# Altium PCB ACF_Out-v2.0.PcbDoc (part 3 of 3)
Units mm, origin at the board's own origin, x right, y up, seen from the top; angles counter-clockwise.
Board outline 145.27 x 100 mm, 2 copper layers (Top Layer, Bottom Layer), stack 1.57 mm thick; 63 components, 69 nets, 230 pads, 136 vias.
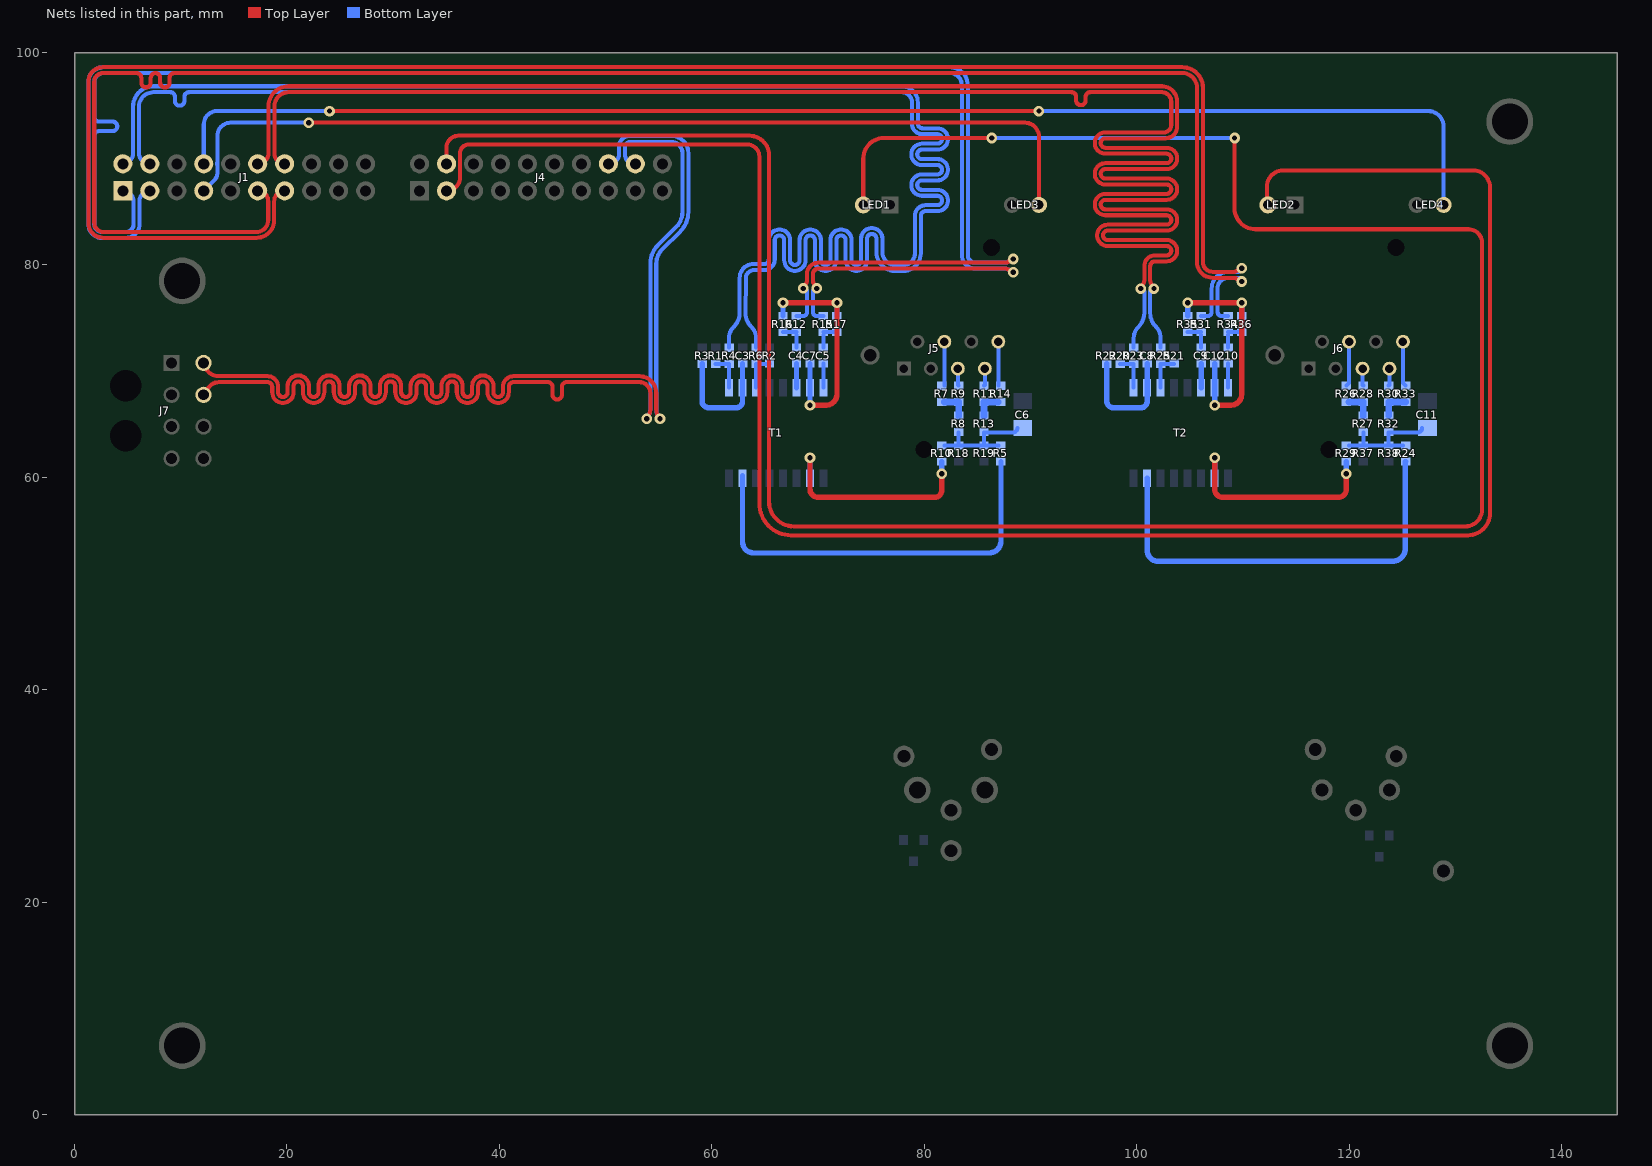
[diagram p2: the nets of this part, all layers, seen from the top]

## Via types
v1: diameter 1, hole 0.5, Top Layer to Bottom Layer, tented both sides, 136 vias

## Nets (pads, with @x,y where several pads share a name; then routed paths per layer and width w, separated by ;. In a path a pad name is that pad's centre, name@x,y a point inside that pad or via, vN(x,y) a via of type N, cw(c..) or ccw(c..) an arc to the next point about the centre after c; other vN are vias at no path point) (continued)
LATCH_N: J4.18 J7.6 | length 105.2
  Top Layer w0.381: J7.6@12.144,67.775 12.625,68.461 cw(c13.601,67.775) 13.601,68.968 16.251,68.968 18.168,68.968 cw(c18.168,68.524) 18.613,68.524 18.613,68.014 ccw(c19.616,68.014) 20.619,68.014 20.619,68.596 cw(c21.064,68.596) 21.508,68.596 21.508,68.014 ccw(c22.512,68.014) 23.515,68.014 23.515,68.596 cw(c23.96,68.596) 24.404,68.596 24.404,68.014 ccw(c25.407,68.014) 26.411,68.014 26.411,68.596 cw(c26.855,68.596) 27.3,68.596 27.3,68.014 ccw(c28.303,68.014) 29.306,68.014 29.306,68.596 cw(c29.751,68.596) 30.195,68.596 30.195,68.014 ccw(c31.199,68.014) 32.202,68.014 32.202,68.596 cw(c32.646,68.596) 33.091,68.596 33.091,68.014 ccw(c34.094,68.014) 35.097,68.014 35.097,68.596 cw(c35.542,68.596) 35.986,68.596 35.986,68.014 ccw(c36.99,68.014) 37.993,68.014 37.993,68.596 cw(c38.438,68.596) 38.882,68.596 38.882,68.014 ccw(c39.885,68.014) 40.889,68.014 40.889,68.524 cw(c41.333,68.524) 41.333,68.968 42.845,68.968 43.478,68.968 44.557,68.968 cw(c44.557,68.524) 45.002,68.524 45.002,67.785 ccw(c45.446,67.785) 45.891,67.785 45.891,68.524 cw(c46.335,68.524) 46.335,68.968 47.752,68.968 53.177,68.968 cw(c53.177,67.934) 54.212,67.934 54.212,66.371 cw(c53.025,66.371) v1(53.864,65.532)
  Bottom Layer w0.381: J4.18@52.806,89.524 52.715,89.524 cw(c52.715,90.424) 51.815,90.424 51.815,91.048 cw(c52.354,91.048) 52.354,91.588 56.198,91.588 cw(c56.198,90.555) 57.231,90.555 57.231,84.988 cw(c55.22,84.988) 56.642,83.566 54.906,81.83 ccw(c56.581,80.154) 54.212,80.154 54.212,80.152 54.212,66.371 cw(c53.429,66.371) 53.982,65.818 ccw(c54.268,65.532) v1(53.864,65.532)
LATCH_P: J4.16 J7.5 | length 105.4
  Top Layer w0.381: J7.5@12.144,70.775 12.41,70.229 ccw(c13.532,70.775) 13.532,69.527 16.251,69.527 18.168,69.527 cw(c18.168,68.524) 19.172,68.524 19.172,68.014 ccw(c19.616,68.014) 20.061,68.014 20.061,68.596 cw(c21.064,68.596) 22.067,68.596 22.067,68.014 ccw(c22.512,68.014) 22.956,68.014 22.956,68.596 cw(c23.96,68.596) 24.963,68.596 24.963,68.014 ccw(c25.407,68.014) 25.852,68.014 25.852,68.596 cw(c26.855,68.596) 27.858,68.596 27.858,68.014 ccw(c28.303,68.014) 28.747,68.014 28.747,68.596 cw(c29.751,68.596) 30.754,68.596 30.754,68.014 ccw(c31.199,68.014) 31.643,68.014 31.643,68.596 cw(c32.646,68.596) 33.65,68.596 33.65,68.014 ccw(c34.094,68.014) 34.539,68.014 34.539,68.596 cw(c35.542,68.596) 36.545,68.596 36.545,68.014 ccw(c36.99,68.014) 37.434,68.014 37.434,68.596 cw(c38.438,68.596) 39.441,68.596 39.441,68.014 ccw(c39.885,68.014) 40.33,68.014 40.33,68.524 cw(c41.333,68.524) 41.333,69.527 42.845,69.527 53.177,69.527 cw(c53.177,67.934) 54.77,67.934 54.77,66.371 ccw(c55.957,66.371) v1(55.118,65.532)
  Bottom Layer w0.381: J4.16@50.266,89.524 50.356,89.524 ccw(c50.356,90.424) 51.256,90.424 51.256,91.109 cw(c52.294,91.109) 52.294,92.146 56.198,92.146 cw(c56.198,90.555) 57.79,90.555 57.79,84.986 cw(c55.224,84.986) 57.038,83.172 55.326,81.46 ccw(c56.668,80.118) 54.77,80.118 54.77,66.371 ccw(c55.553,66.371) 55,65.818 cw(c54.714,65.532) v1(55.118,65.532)
NetC3_2: C3.2 R3.2 T1.2 | length 11.6
  Bottom Layer w0.508: R3.2@59.083,70.685 59.083,67.19 ccw(c59.718,67.19) 59.718,66.555 62.291,66.555 ccw(c62.291,67.158) 62.893,67.158 T1.2@62.893,68.446 C3.2@62.893,70.711
NetC4_1: C4.1 R12.2 R16.1 | length 2.5
  Bottom Layer w0.381: R16.1@66.703,73.671 R12.2@67.969,73.671 ; R12.2@67.969,73.417 67.969,72.235 C4.1@67.973,72.235
NetC4_2: C4.2 T1.6 | length 2.3
  Bottom Layer w0.508: T1.6@67.973,68.446 C4.2@67.973,70.711
NetC5_1: C5.1 R15.2 R17.1 | length 2.5
  Bottom Layer w0.381: C5.1@70.513,72.235 R15.2@70.513,73.417 ; R15.2@70.513,73.671 R17.1@71.783,73.671
NetC5_2: C5.2 T1.8 | length 2.3
  Bottom Layer w0.381: T1.8@70.513,68.446 C5.2@70.513,70.711
NetC6_2: C6.2 R5.1 R8.2 R10.1 R13.2 R18.1 R19.2 | length 10.9
  Bottom Layer w0.381: R10.1@81.895,63.017 R18.1@83.241,63.017 ; R8.2@83.241,64.237 R18.1@83.241,63.017 ; R5.1@86.975,63.017 R19.2@85.629,63.017 ; C6.2@88.773,64.643 cw(c88.367,64.643) 88.367,64.237 85.629,64.237 R19.2@85.629,63.017 ; R18.1@83.241,63.017 R19.2@85.629,63.017
NetC7_2: C7.2 R16.2 R17.2 T1.7 | length 23.3
  Top Layer w0.508: v1(66.703,76.454) v1(71.783,76.454) 71.783,67.818 cw(c70.767,67.818) 70.767,66.802 v1(69.243,66.802)
  Bottom Layer w0.508: R16.2@66.703,75.195 v1(66.703,76.454) ; v1(69.243,66.802) T1.7@69.243,68.446 C7.2@69.243,70.711 ; R17.2@71.783,75.195 v1(71.783,76.454)
NetC8_2: C8.2 R22.2 T2.2 | length 11.6
  Bottom Layer w0.508: R22.2@97.183,70.685 97.183,67.19 ccw(c97.818,67.19) 97.818,66.555 100.391,66.555 ccw(c100.391,67.158) 100.993,67.158 T2.2@100.993,68.446 C8.2@100.993,70.711
NetC9_1: C9.1 R31.2 R35.1 | length 2.5
  Bottom Layer w0.381: R35.1@104.803,73.671 R31.2@106.069,73.671 ; R31.2@106.069,73.417 106.069,72.235 C9.1@106.073,72.235
NetC9_2: C9.2 T2.6 | length 2.3
  Bottom Layer w0.508: T2.6@106.073,68.446 C9.2@106.073,70.711
NetC10_1: C10.1 R34.2 R36.1 | length 2.5
  Bottom Layer w0.381: C10.1@108.613,72.235 R34.2@108.613,73.417 ; R34.2@108.613,73.671 R36.1@109.883,73.671
NetC10_2: C10.2 T2.8 | length 2.3
  Bottom Layer w0.381: T2.8@108.613,68.446 C10.2@108.613,70.711
NetC11_2: C11.2 R24.1 R27.2 R29.1 R32.2 R37.1 R38.2 | length 10.9
  Bottom Layer w0.381: R29.1@119.995,63.017 R37.1@121.341,63.017 ; R27.2@121.341,64.237 R37.1@121.341,63.017 ; R24.1@125.075,63.017 R38.2@123.729,63.017 ; C11.2@126.873,64.643 cw(c126.467,64.643) 126.467,64.237 123.729,64.237 R38.2@123.729,63.017 ; R37.1@121.341,63.017 R38.2@123.729,63.017
NetC12_2: C12.2 R35.2 R36.2 T2.7 | length 23.3
  Top Layer w0.508: v1(104.803,76.454) v1(109.883,76.454) 109.883,67.818 cw(c108.867,67.818) 108.867,66.802 v1(107.343,66.802)
  Bottom Layer w0.508: R35.2@104.803,75.195 v1(104.803,76.454) ; v1(107.343,66.802) T2.7@107.343,68.446 C12.2@107.343,70.711 ; R36.2@109.883,75.195 v1(109.883,76.454)
NetJ5_4: J5.4 R7.1 | length 4.1
  Bottom Layer w0.381: R7.1@81.895,68.631 J5.4@81.895,72.775
NetJ5_5: J5.5 R9.1 | length 1.6
  Bottom Layer w0.381: J5.5@83.165,70.235 83.165,68.707 R9.1@83.241,68.631
NetJ5_7: J5.7 R11.1 | length 1.6
  Bottom Layer w0.381: R11.1@85.629,68.631 85.705,68.707 J5.7@85.705,70.235
NetJ5_8: J5.8 R14.1 | length 4.1
  Bottom Layer w0.381: R14.1@86.975,68.631 J5.8@86.975,72.775
NetJ6_4: J6.4 R26.1 | length 4.2
  Bottom Layer w0.381: R26.1@119.745,68.631 119.995,68.881 J6.4@119.995,72.775
NetJ6_5: J6.5 R28.1 | length 1.6
  Bottom Layer w0.381: J6.5@121.265,70.235 121.265,68.707 R28.1@121.341,68.631
NetJ6_7: J6.7 R30.1 | length 1.6
  Bottom Layer w0.381: R30.1@123.729,68.631 123.805,68.707 J6.7@123.805,70.235
NetJ6_8: J6.8 R33.1 | length 4.2
  Bottom Layer w0.381: J6.8@125.075,72.775 125.075,68.881 R33.1@125.325,68.631
NetR1_2: R1.2 R4.2 T1.1 | length 3.5
  Bottom Layer w0.381: R1.2@60.353,70.685 R4.2@61.623,70.685 T1.1@61.623,68.446
NetR2_2: R2.2 R6.2 T1.3 | length 3.5
  Bottom Layer w0.381: T1.3@64.163,68.446 R6.2@64.163,70.685 65.408,70.685 ccw(c65.408,70.711) R2.2@65.433,70.711
NetR5_2: R5.2 T1.15 | length 39.3
  Bottom Layer w0.508: T1.15@62.893,60.173 T1.15@62.893,59.916 62.893,53.911 ccw(c63.921,53.911) 63.921,52.883 86.107,52.883 ccw(c86.107,54) 87.225,54 R5.2@87.225,61.493
NetR7_2: R7.2 R8.1 R9.2 | length 2.7
  Bottom Layer w0.635: R7.2@81.895,67.107 R9.2@83.241,67.107 R8.1@83.241,65.761
NetR10_2: R10.2 T1.10 | length 20.8
  Top Layer w0.508: v1(69.243,61.837) 69.243,58.906 ccw(c70.03,58.906) 70.03,58.119 80.989,58.119 ccw(c80.989,58.774) 81.645,58.774 v1(81.645,60.344)
  Bottom Layer w0.508: T1.10@69.243,59.916 v1(69.243,61.837) ; v1(81.645,60.344) R10.2@81.645,61.493
NetR11_2: R11.2 R13.1 R14.2 | length 2.7
  Bottom Layer w0.635: R13.1@85.629,65.761 R11.2@85.629,67.107 R14.2@86.975,67.107
NetR20_2: R20.2 R23.2 T2.1 | length 3.5
  Bottom Layer w0.381: R20.2@98.453,70.685 R23.2@99.723,70.685 T2.1@99.723,68.446
NetR21_2: R21.2 R25.2 T2.3 | length 3.5
  Bottom Layer w0.381: T2.3@102.263,68.446 R25.2@102.263,70.685 R21.2@103.508,70.685
NetR24_2: R24.2 T2.15 | length 40.6
  Bottom Layer w0.508: T2.15@100.993,59.916 100.993,53.15 ccw(c102.056,53.15) 102.056,52.087 124.056,52.087 ccw(c124.056,53.337) 125.306,53.337 125.306,61.475 cw(c125.325,61.475) R24.2@125.325,61.493
NetR26_2: R26.2 R27.1 R28.2 | length 2.7
  Bottom Layer w0.635: R26.2@119.995,67.107 R28.2@121.341,67.107 R27.1@121.341,65.761
NetR29_2: R29.2 T2.10 | length 20.7
  Top Layer w0.508: v1(107.343,61.837) 107.343,58.906 ccw(c108.13,58.906) 108.13,58.119 118.979,58.119 ccw(c118.979,58.885) 119.745,58.885 v1(119.745,60.344)
  Bottom Layer w0.508: T2.10@107.343,59.916 v1(107.343,61.837) ; v1(119.745,60.344) R29.2@119.745,61.493
NetR30_2: R30.2 R32.1 R33.2 | length 2.9
  Bottom Layer w0.635: R32.1@123.729,65.811 R30.2@123.729,67.107 R33.2@125.325,67.107
P1LED: J1.07 LED3.1 | length 90.9
  Top Layer w0.381: v1(22.05,93.396) 89.484,93.396 cw(c89.484,92.08) 90.8,92.08 LED3.1@90.8,85.655
  Bottom Layer w0.381: J1.07@12.166,86.984 13.18,87.999 ccw(c12.555,88.624) 13.439,88.624 13.439,89.446 ccw(c13.058,89.446) 13.439,89.464 cw(c14.706,89.524) 13.439,89.585 ccw(c13.058,89.603) 13.439,89.603 13.439,92.148 cw(c14.687,92.148) 14.687,93.396 v1(22.05,93.396)
P2LED: J1.08 LED4.1 | length 129.4
  Top Layer w0.381: v1(24.006,94.488) v1(90.8,94.488)
  Bottom Layer w0.381: J1.08@12.166,89.524 12.166,93.238 cw(c13.416,93.238) 13.416,94.488 v1(24.006,94.488) ; v1(90.8,94.488) 127.459,94.488 cw(c127.459,93.047) 128.9,93.047 LED4.1@128.9,85.655
RXI1_N: J1.01 R15.1 | length 154
  Top Layer w0.381: v1(69.868,77.792) ccw(c69.464,77.792) 69.75,78.078 69.694,78.134 cw(c70.114,78.553) 69.521,78.553 69.521,79.144 cw(c70.03,79.144) 70.03,79.653 87.626,79.653 cw(c87.626,79.06) 88.045,79.48 88.101,79.424 ccw(c88.387,79.71) v1(88.387,79.306)
  Bottom Layer w0.381: J1.01@4.546,86.984 cw(c4.546,85.965) 5.565,85.965 5.565,83.845 cw(c4.829,83.845) 4.829,83.109 2.592,83.109 cw(c2.592,83.845) 1.855,83.845 1.855,91.084 1.855,92.164 cw(c2.3,92.164) 2.3,92.608 3.58,92.608 ccw(c3.58,93.053) 3.58,93.497 2.3,93.497 cw(c2.3,93.942) 1.855,93.942 1.855,95.737 1.855,97.183 cw(c2.74,97.183) 2.74,98.068 82.394,98.068 cw(c82.394,96.919) 83.543,96.919 83.543,80.926 ccw(c84.816,80.926) 84.816,79.653 87.626,79.653 cw(c87.626,79.06) 88.045,79.48 88.101,79.424 ccw(c88.387,79.71) v1(88.387,79.306) ; v1(69.868,77.792) ccw(c69.868,77.445) 69.521,77.445 69.521,75.576 ccw(c69.902,75.576) 69.902,75.195 R15.1@70.513,75.195
RXI1_P: J1.03 R12.1 | length 153.9
  Top Layer w0.381: v1(68.614,77.792) cw(c69.018,77.792) 68.733,78.078 68.788,78.134 ccw(c68.368,78.553) 68.962,78.553 68.962,79.144 cw(c70.03,79.144) 70.03,80.212 87.626,80.212 ccw(c87.626,80.806) 88.045,80.386 88.101,80.441 cw(c88.387,80.156) v1(88.387,80.56)
  Bottom Layer w0.381: J1.03@7.086,86.984 ccw(c7.086,86.023) 6.124,86.023 6.124,83.845 cw(c4.829,83.845) 4.829,82.55 2.592,82.55 cw(c2.592,83.845) 1.297,83.845 1.297,97.183 cw(c2.74,97.183) 2.74,98.627 82.394,98.627 cw(c82.394,96.919) 84.102,96.919 84.102,80.926 ccw(c84.816,80.926) 84.816,80.212 87.626,80.212 ccw(c87.626,80.806) 88.045,80.386 88.101,80.441 cw(c88.387,80.156) v1(88.387,80.56) ; R12.1@67.969,75.195 68.581,75.195 ccw(c68.581,75.576) 68.962,75.576 68.962,77.445 ccw(c68.614,77.445) v1(68.614,77.792)
RXI2_N: J1.11 R34.1 | length 171.1
  Top Layer w0.381: J1.11@17.246,86.984 cw(c17.246,85.99) 18.24,85.99 18.24,84.226 cw(c17.122,84.226) 17.122,83.109 2.722,83.109 cw(c2.722,83.976) 1.855,83.976 1.855,97.236 cw(c2.688,97.236) 2.688,98.068 4.76,98.068 5.839,98.068 cw(c5.839,97.623) 6.284,97.623 6.284,97.162 ccw(c6.728,97.162) 7.173,97.162 7.173,97.623 cw(c7.617,97.623) 8.062,97.623 8.062,97.162 ccw(c8.506,97.162) 8.951,97.162 8.951,97.623 cw(c9.395,97.623) 9.395,98.068 10.146,98.068 104.292,98.068 cw(c104.292,96.679) 105.681,96.679 105.681,80.276 ccw(c107.166,80.276) 107.166,78.791 109.122,78.791 cw(c109.122,78.197) 109.542,78.617 109.597,78.562 ccw(c109.883,78.848) v1(109.883,78.443)
  Bottom Layer w0.381: R34.1@108.613,75.195 108.002,75.195 cw(c108.002,75.576) 107.621,75.576 107.621,77.773 cw(c108.638,77.773) 108.638,78.791 109.535,78.791 cw(c109.535,78.443) v1(109.883,78.443)
RXI2_P: J1.13 R31.1 | length 170.7
  Top Layer w0.381: J1.13@19.786,86.984 ccw(c19.786,85.997) 18.799,85.997 18.799,84.226 cw(c17.122,84.226) 17.122,82.55 2.722,82.55 cw(c2.722,83.976) 1.297,83.976 1.297,97.236 cw(c2.688,97.236) 2.688,98.627 104.292,98.627 cw(c104.292,96.679) 106.239,96.679 106.239,80.276 ccw(c107.166,80.276) 107.166,79.35 109.122,79.35 ccw(c109.122,79.943) 109.542,79.523 109.597,79.579 cw(c109.883,79.293) v1(109.883,79.697)
  Bottom Layer w0.381: R31.1@106.069,75.195 106.681,75.195 ccw(c106.681,75.576) 107.062,75.576 107.062,77.773 cw(c108.638,77.773) 108.638,79.35 109.535,79.35 ccw(c109.535,79.697) v1(109.883,79.697)
TXI1_N: J1.02 R6.1 | length 157.2
  Bottom Layer w0.381: J1.02@4.546,89.524 ccw(c4.546,90.493) 5.514,90.493 5.514,94.918 cw(c7.421,94.918) 7.421,96.824 77.884,96.824 cw(c77.884,95.308) 79.4,95.308 ; R6.1@64.163,72.209 64.163,73.106 ccw(c62.645,73.106) 63.718,74.179 63.706,74.192 cw(c64.98,75.465) 63.179,75.465 63.201,78.721 cw(c63.995,78.721) 63.995,79.515 64.925,79.515 ccw(c64.925,80.518) 65.928,80.518 65.928,82.336 cw(c66.373,82.336) 66.817,82.336 66.817,80.446 ccw(c67.82,80.446) 68.824,80.446 68.824,82.336 cw(c69.268,82.336) 69.713,82.336 69.713,80.446 ccw(c70.716,80.446) 71.719,80.446 71.719,82.336 cw(c72.164,82.336) 72.608,82.336 72.608,80.446 ccw(c73.612,80.446) 74.615,80.446 74.615,82.48 cw(c75.059,82.48) 75.504,82.48 75.504,81.198 ccw(c77.263,81.198) 77.263,79.439 78.035,79.439 ccw(c78.035,81.083) 79.679,81.083 79.679,84.622 cw(c80.124,84.622) 80.124,85.067 81.237,85.067 ccw(c81.237,86.07) 81.237,87.073 79.787,87.073 cw(c79.787,87.518) 79.787,87.962 81.237,87.962 ccw(c81.237,88.965) 81.237,89.969 79.787,89.969 cw(c79.787,90.413) 79.787,90.858 81.237,90.858 ccw(c81.237,91.861) 81.237,92.864 ; 79.4,95.228 79.4,93.309 ccw(c79.844,93.309) 79.844,92.864 81.237,92.864 ; 82.235,91.757 ccw(c81.237,91.861) 81.237,92.864
TXI1_P: J1.04 R4.1 | length 155.6
  Bottom Layer w0.381: J1.04@7.086,89.524 cw(c7.086,90.537) 6.073,90.537 6.073,94.918 cw(c7.421,94.918) 7.421,96.266 7.927,96.266 9.006,96.266 cw(c9.006,95.821) 9.451,95.821 9.451,95.442 ccw(c9.895,95.442) 10.34,95.442 10.34,95.821 cw(c10.784,95.821) 10.784,96.266 11.506,96.266 77.884,96.266 cw(c77.884,95.308) 78.841,95.308 ; R4.1@61.623,72.209 61.623,73.106 cw(c63.141,73.106) 62.067,74.179 ccw(c60.733,75.514) 62.62,75.465 62.62,78.77 62.62,78.773 cw(c63.928,78.773) 63.992,80.08 64.109,80.074 64.925,80.074 ccw(c64.925,80.518) 65.369,80.518 65.369,82.336 cw(c66.373,82.336) 67.376,82.336 67.376,80.446 ccw(c67.82,80.446) 68.265,80.446 68.265,82.336 cw(c69.268,82.336) 70.271,82.336 70.271,80.446 ccw(c70.716,80.446) 71.16,80.446 71.16,82.336 cw(c72.164,82.336) 73.167,82.336 73.167,80.446 ccw(c73.612,80.446) 74.056,80.446 74.056,82.48 cw(c75.059,82.48) 76.063,82.48 76.063,81.198 ccw(c77.263,81.198) 77.263,79.998 78.035,79.998 ccw(c78.035,81.083) 79.12,81.083 79.12,84.622 cw(c80.124,84.622) 80.124,85.625 81.237,85.625 ccw(c81.237,86.07) 81.237,86.514 79.787,86.514 cw(c79.787,87.518) 79.787,88.521 81.237,88.521 ccw(c81.237,88.965) 81.237,89.41 79.787,89.41 cw(c79.787,90.413) 79.787,91.417 81.237,91.417 ccw(c81.237,91.861) 81.237,92.306 79.844,92.306 cw(c79.844,93.309) 78.841,93.309 78.841,95.228
TXI2_N: J1.12 R25.1 | length 171.3
  Top Layer w0.381: J1.12@17.246,89.524 ccw(c17.246,90.544) 18.265,90.544 18.265,94.944 cw(c20.146,94.944) 20.146,96.824 102.368,96.824 cw(c102.368,95.377) 103.816,95.377 103.816,93.038 cw(c102.698,93.038) 102.698,91.921 97.06,91.921 ccw(c97.06,91.476) 97.06,91.032 102.815,91.032 cw(c102.815,90.029) 102.815,89.025 97.06,89.025 ccw(c97.06,88.581) 97.06,88.136 102.815,88.136 cw(c102.815,87.133) 102.815,86.13 97.06,86.13 ccw(c97.06,85.685) 97.06,85.241 102.815,85.241 cw(c102.815,84.237) 102.815,83.234 97.282,83.234 ccw(c97.282,82.79) 97.282,82.345 102.815,82.345 cw(c102.815,81.342) 102.815,80.338 101.723,80.338 ccw(c101.723,79.894) 101.279,79.894 101.279,78.536 ccw(c101.872,78.536) 101.452,78.116 101.508,78.061 cw(c101.222,77.775) v1(101.626,77.775)
  Bottom Layer w0.381: v1(101.626,77.775) ccw(c101.626,77.427) 101.279,77.427 101.279,75.465 ccw(c103.08,75.465) 101.806,74.192 101.818,74.179 cw(c100.745,73.106) 102.263,73.106 R25.1@102.263,72.209
TXI2_P: J1.14 R23.1 | length 171.1
  Top Layer w0.381: J1.14@19.786,89.524 cw(c19.786,90.486) 18.824,90.486 18.824,94.944 cw(c20.146,94.944) 20.146,96.266 92.781,96.266 93.86,96.266 cw(c93.86,95.821) 94.305,95.821 94.305,95.49 ccw(c94.749,95.49) 95.194,95.49 95.194,95.821 cw(c95.638,95.821) 95.638,96.266 96.52,96.266 102.368,96.266 cw(c102.368,95.377) 103.257,95.377 103.257,93.19 cw(c102.547,93.19) 102.547,92.48 97.06,92.48 ccw(c97.06,91.476) 97.06,90.473 102.815,90.473 cw(c102.815,90.029) 102.815,89.584 97.06,89.584 ccw(c97.06,88.581) 97.06,87.577 102.815,87.577 cw(c102.815,87.133) 102.815,86.688 97.06,86.688 ccw(c97.06,85.685) 97.06,84.682 102.815,84.682 cw(c102.815,84.237) 102.815,83.793 97.282,83.793 ccw(c97.282,82.79) 97.282,81.786 102.815,81.786 cw(c102.815,81.342) 102.815,80.897 101.723,80.897 ccw(c101.723,79.894) 100.72,79.894 100.72,78.536 cw(c100.126,78.536) 100.546,78.116 100.491,78.061 ccw(c100.777,77.775) v1(100.372,77.775)
  Bottom Layer w0.381: R23.1@99.723,72.209 99.723,73.106 cw(c101.241,73.106) 100.167,74.179 ccw(c98.833,75.514) 100.72,75.465 100.72,77.427 ccw(c100.372,77.427) v1(100.372,77.775)
W5500_LED_ACT: J4.03 LED2.2 | length 193.1
  Top Layer w0.381: J4.03@35.026,86.984 ccw(c35.026,88.258) 36.299,88.258 36.299,88.417 36.298,89.207 ; 36.297,89.207 36.297,89.503 36.297,90.05 36.297,90.505 cw(c37.129,90.505) 37.129,91.337 63.343,91.337 cw(c63.343,90.201) 64.479,90.201 64.479,57.544 ccw(c67.475,57.544) 67.475,54.547 131.179,54.547 ccw(c131.179,56.638) 133.269,56.638 133.269,87.317 ccw(c131.686,87.317) 131.686,88.9 113.792,88.9 ccw(c113.792,87.376) 112.268,87.376 112.268,85.747 ccw(c112.36,85.747) LED2.2@112.36,85.655
W5500_LED_LINK: J4.04 LED1.2 | length 232.9
  Top Layer w0.381: J4.04@35.026,89.524 35.026,91.048 cw(c36.15,91.048) 36.15,92.173 63.538,92.173 cw(c63.538,90.318) 65.393,90.318 65.393,57.719 ccw(c67.726,57.719) 67.726,55.386 130.954,55.386 ccw(c130.954,56.947) 132.514,56.947 132.514,82.093 ccw(c131.244,82.093) 131.244,83.363 111.201,83.363 cw(c111.201,85.344) 109.22,85.344 v1(109.22,91.948) ; LED1.2@74.26,85.655 74.26,90.008 cw(c76.2,90.008) 76.2,91.948 v1(86.36,91.948)
  Bottom Layer w0.381: v1(86.36,91.948) v1(109.22,91.948)
pads on no net: J2.4 J2.5 J3.4 J3.5 J5. J6. J7. T1.4 T1.5 T1.12 T1.13 T2.4 T2.5 T2.12 T2.13

## Polygon pours and split planes (outlines as drawn)
GND_DRIVE on Top Layer "NONET_L-01_P-001" (solid, pour order 0): 71.326,84.176 ccw(c71.935,84.176) 71.935,83.566 88.575,83.566 ccw(c88.609,84.418) 89.461,84.385 89.461,86.194 ccw(c88.979,86.194) 88.979,86.677 71.935,86.677 ccw(c71.935,86.067) 71.326,86.067
GND on Top Layer "NONET_L-01_P-001" (solid, pour order 1): 0,0 0,100 145.27,100 145.27,0
GND_DRIVE on Bottom Layer "NONET_L-01_P-001" (solid, pour order 3): 126.759,86.677 cw(c126.759,85.89) 127.545,85.89 127.545,83.603 cw(c126.81,83.603) 126.81,82.868 94.377,82.868 85.731,82.868 cw(c85.731,83.273) 85.326,83.273 85.326,86.067 cw(c85.935,86.067) 85.935,86.677
GND on Bottom Layer "NONET_L-01_P-001" (solid, pour order 2): 0,0 0,100 145.27,100 145.27,0

## Other copper
Multi-Layer:
  pour cut-out: 135.135,89.767 cw(c135.135,93.5) 131.402,93.5 cw(c135.135,93.5) 135.135,97.233 cw(c135.135,93.5) 138.868,93.5 cw(c135.135,93.5)
  pour cut-out: 10.135,2.767 cw(c10.135,6.5) 6.402,6.5 cw(c10.135,6.5) 10.135,10.233 cw(c10.135,6.5) 13.868,6.5 cw(c10.135,6.5)
  pour cut-out: 135.135,2.767 cw(c135.135,6.5) 131.402,6.5 cw(c135.135,6.5) 135.135,10.233 cw(c135.135,6.5) 138.868,6.5 cw(c135.135,6.5)

## Silkscreen, mask and mechanical layers (free items; w line width, h text height)
Top Overlay:
  text "ACF_OUT" at 115.038,96.869 h1.4
  text "rev_001-03" at 113.06,93.906 h1.4
Bottom Overlay:
  lines w0.254: 60.643,69.926 58.115,69.926 58.115,75.946 73.711,75.946 73.711,69.926 62.893,69.926 ; 61.09,75.946 61.09,87.034 ; 84.76,56.109 84.76,59.047 ; 98.743,69.926 96.215,69.926 96.215,75.946 111.811,75.946 111.811,69.926 100.993,69.926 ; 99.19,75.946 99.19,77.343 ; 111.735,87.122 111.735,89.306 87.249,89.306 87.249,77.343 111.794,77.343 111.794,84.024 ; 122.86,56.109 122.86,59.047 ; 58.617,87.034 58.617,96.672 83.162,96.672 83.162,87.034 58.617,87.034 ; 78.924,38.911 92.513,38.911 92.513,56.082 78.924,56.082 78.924,38.911 ; 79.07,59.08 91.44,59.08 91.44,69.926 79.07,69.926 79.07,59.08 ; 117.17,59.08 129.54,59.08 129.54,69.926 117.17,69.926 117.17,59.08 ; 117.323,38.862 131.75,38.862 131.75,56.032 117.323,56.032 117.323,38.862
Dimension:
  circle w0.013: c135.135,93.5 r1.7
  circle w0.013: c135.135,6.5 r1.7
  circle w0.013: c10.135,6.5 r1.7
  circle w0.013: c10.135,78.5 r1.7
  circle w0.013: c124.44,33.745 r0.6
  circle w0.013: c78.72,34.38 r0.6
  circle w0.013: c79.355,30.57 r0.6
  circle w0.013: c123.805,30.57 r0.6
  circle w0.013: c120.63,28.665 r0.6
  circle w0.013: c117.455,30.57 r0.6
  circle w0.013: c116.82,34.38 r0.6
  circle w0.013: c82.53,28.665 r0.6
  circle w0.013: c85.705,30.57 r0.6
  circle w0.013: c86.34,33.745 r0.6
  circle w0.013: c128.885,22.95 r0.6
  circle w0.013: c117.455,72.775 r0.4
  circle w0.013: c89.53,85.655 r0.25
  circle w0.013: c78.085,70.235 r0.4
  circle w0.013: c80.625,70.235 r0.4
  circle w0.013: c83.165,70.235 r0.4
  circle w0.013: c85.705,70.235 r0.4
  circle w0.013: c79.99,62.615 r0.8
  circle w0.013: c86.34,81.665 r0.8
  circle w0.013: c75.53,85.655 r0.25
  circle w0.013: c74.91,71.505 r0.6
  circle w0.013: c118.725,70.235 r0.4
  circle w0.013: c121.265,70.235 r0.4
  circle w0.013: c123.805,70.235 r0.4
  circle w0.013: c118.09,62.615 r0.8
  circle w0.013: c119.995,72.775 r0.4
  circle w0.013: c122.535,72.775 r0.4
  circle w0.013: c125.075,72.775 r0.4
  circle w0.013: c116.185,70.235 r0.4
  circle w0.013: c127.63,85.655 r0.25
  circle w0.013: c113.01,71.505 r0.6
  circle w0.013: c113.63,85.655 r0.25
  circle w0.013: c124.44,81.665 r0.8
  circle w0.013: c79.355,72.775 r0.4
  circle w0.013: c81.895,72.775 r0.4
  circle w0.013: c84.435,72.775 r0.4
  circle w0.013: c86.975,72.775 r0.4
  circle w0.013: c52.806,89.524 r0.55
  circle w0.013: c50.266,86.984 r0.55
  circle w0.013: c50.266,89.524 r0.55
  circle w0.013: c47.726,86.984 r0.55
  circle w0.013: c55.346,86.984 r0.55
  circle w0.013: c55.346,89.524 r0.55
  circle w0.013: c52.806,86.984 r0.55
  circle w0.013: c19.786,89.524 r0.55
  circle w0.013: c17.246,86.984 r0.55
  circle w0.013: c17.246,89.524 r0.55
  circle w0.013: c14.706,86.984 r0.55
  circle w0.013: c24.866,89.524 r0.55
  circle w0.013: c22.326,86.984 r0.55
  circle w0.013: c22.326,89.524 r0.55
  circle w0.013: c19.786,86.984 r0.55
  circle w0.013: c9.626,89.524 r0.55
  circle w0.013: c7.086,86.984 r0.55
  circle w0.013: c7.086,89.524 r0.55
  circle w0.013: c4.546,86.984 r0.55
  circle w0.013: c14.706,89.524 r0.55
  circle w0.013: c12.166,86.984 r0.55
  circle w0.013: c12.166,89.524 r0.55
  circle w0.013: c9.626,86.984 r0.55
  circle w0.013: c42.646,89.524 r0.55
  circle w0.013: c40.106,86.984 r0.55
  circle w0.013: c40.106,89.524 r0.55
  circle w0.013: c37.566,86.984 r0.55
  circle w0.013: c47.726,89.524 r0.55
  circle w0.013: c45.186,86.984 r0.55
  circle w0.013: c45.186,89.524 r0.55
  circle w0.013: c42.646,86.984 r0.55
  circle w0.013: c32.486,89.524 r0.55
  circle w0.013: c27.406,86.984 r0.55
  circle w0.013: c27.406,89.524 r0.55
  circle w0.013: c24.866,86.984 r0.55
  circle w0.013: c37.566,89.524 r0.55
  circle w0.013: c35.026,86.984 r0.55
  circle w0.013: c35.026,89.524 r0.55
  circle w0.013: c32.486,86.984 r0.55
  circle w0.013: c4.546,89.524 r0.55
  lines w0.013: 0,0 145.27,0 145.27,100 0,100 0,0
Board Outline:
  circle w0.254: c30.05,52.09 r10
  lines w0.254: 0,0 145.27,0 145.27,100 0,100 0,0
Fabrication:
  drawing of 191 lines, arcs and shapes, not listed
  text "Layer" at 183.295,97.46 h1.52
  text "Name" at 193.707,97.46 h1.52
  text "Material" at 217.322,97.46 h1.52
  text "Thickness" at 231.543,97.46 h1.52
  text "Constant" at 248.049,97.46 h1.52
  text "Board Layer Stack" at 262.523,97.46 h1.52
  text "Top Overlay" at 193.707,94.412 h1.52
  text "Top Solder" at 193.707,91.364 h1.52
  text "SM-004" at 217.322,91.364 h1.52
  text "0.025mm" at 231.543,91.364 h1.52
  text "4" at 248.049,91.364 h1.52
  text "1" at 183.295,88.316 h1.52
  text "Top Layer" at 193.707,88.316 h1.52
  text "0.035mm" at 231.543,88.316 h1.52
  text "Dielectric 1" at 193.707,85.268 h1.52
  text "FR-4" at 217.322,85.268 h1.52
  text "1.500mm" at 231.543,85.268 h1.52
  text "4.8" at 248.049,85.268 h1.52
  text "2" at 183.295,82.22 h1.52
  text "Bottom Layer" at 193.707,82.22 h1.52
  text "0.035mm" at 231.543,82.22 h1.52
  text "Bottom Solder" at 193.707,79.172 h1.52
  text "SM-004" at 217.322,79.172 h1.52
  text "0.025mm" at 231.543,79.172 h1.52
  text "4" at 248.049,79.172 h1.52
  text "Bottom Overlay" at 193.707,76.124 h1.52
  text "Total board thickness:" at 183.295,73.076 h1.52
  text "1.620mm" at 231.543,73.076 h1.52
Drill Drawing:
  circle w0.254: c3.953,150.465 r0.508
  circle w0.254: c3.953,150.465 r0.847
  circle w0.254: c3.953,135.225 r0.847
  lines w0.254: 3.106,122.949 3.106,123.372 3.53,123.795 3.106,124.219 3.106,124.642 3.53,124.642 3.953,124.219 4.376,124.642 4.8,124.642 4.8,124.219 4.376,123.795 4.8,123.372 4.8,122.949 4.376,122.949 3.953,123.372 3.53,122.949 3.106,122.949 ; 3.106,126.759 4.8,126.759 4.8,128.452 3.106,128.452 3.106,126.759 ; 3.106,130.992 3.53,130.992 3.53,130.569 4.376,130.569 4.376,130.992 4.8,130.992 4.8,131.839 4.376,131.839 4.376,132.262 3.53,132.262 3.53,131.839 3.106,131.839 3.106,130.992 ; 3.106,138.612 3.53,138.612 3.53,138.189 4.376,138.189 4.376,138.612 4.8,138.612 4.8,139.459 4.376,139.459 4.376,139.882 3.53,139.882 3.53,139.459 3.106,139.459 3.106,138.612 ; 3.106,142.422 3.53,142.422 3.953,141.999 4.376,142.422 4.8,142.422 4.376,142.845 4.8,143.269 4.376,143.269 3.953,143.692 3.53,143.269 3.106,143.269 3.53,142.845 3.106,142.422 ; 3.106,145.809 3.953,146.232 4.8,145.809 4.376,146.655 4.8,147.502 3.953,147.079 3.106,147.502 3.53,146.655 3.106,145.809 ; 3.106,153.429 4.8,153.429 4.8,155.122 3.106,155.122 3.106,153.429 ; 3.106,157.239 3.953,157.662 4.8,157.239 4.376,158.085 4.8,158.932 3.953,158.509 3.106,158.932 3.53,158.085 3.106,157.239 ; 3.106,162.742 4.8,162.742 3.953,161.049 3.106,162.742 ; 3.445,138.781 3.699,138.781 3.699,138.527 4.207,138.527 4.207,138.781 4.461,138.781 4.461,139.289 4.207,139.289 4.207,139.543 3.699,139.543 3.699,139.289 3.445,139.289 3.445,138.781 ; 3.445,142.591 3.699,142.591 3.953,142.337 4.207,142.591 4.461,142.591 4.207,142.845 4.461,143.099 4.207,143.099 3.953,143.353 3.699,143.099 3.445,143.099 3.699,142.845 3.445,142.591 ; 3.445,153.767 4.461,153.767 4.461,154.783 3.445,154.783 3.445,153.767 ; 3.445,157.577 3.953,157.831 4.461,157.577 4.207,158.085 4.461,158.593 3.953,158.339 3.445,158.593 3.699,158.085 3.445,157.577
  lines w0.381: 1.587,121.806 289.136,121.806 ; 1.587,163.716 289.136,163.716 ; 15.58,117.996 15.58,167.526 ; 30.816,117.996 30.816,167.526 ; 60.017,117.996 60.017,167.526 ; 72.866,117.996 72.866,167.526 ; 91.505,117.996 91.505,167.526 ; 129.594,117.996 129.594,167.526 ; 144.576,117.996 144.576,167.526 ; 163.519,117.996 163.519,167.526 ; 198.561,117.996 198.561,167.526 ; 220.246,117.996 220.246,167.526 ; 254.12,117.996 254.12,167.526 ; 1.587,117.996 289.136,117.996 289.136,167.526 1.587,167.526 1.587,117.996
  text "Symbol" at 3.873,164.859 h1.83
  text "Count" at 16.723,164.859 h1.83
  text "Hole Size" at 31.959,164.859 h1.83
  text "Plated" at 61.16,164.859 h1.83
  text "Hole Type" at 74.009,164.859 h1.83
  text "Drill Layer Pair" at 92.648,164.859 h1.83
  text "Via/Pad" at 130.737,164.859 h1.83
  text "Pad Shape" at 145.719,164.859 h1.83
  text "Template" at 164.662,164.859 h1.83
  text "Description" at 199.704,164.859 h1.83
  text "Hole Tolerance (+)" at 221.389,164.859 h1.83
  text "Hole Tolerance (-)" at 255.263,164.859 h1.83
  text "2" at 16.723,161.049 h1.52
  text "62.99mil (1.600mm)" at 31.959,161.049 h1.52
  text "PTH" at 61.16,161.049 h1.52
  text "Round" at 74.009,161.049 h1.52
  text "Top Layer - Bottom Layer" at 92.648,161.049 h1.52
  text "Pad" at 130.737,161.049 h1.52
  text "Rounded" at 145.719,161.049 h1.52
  text "c250h160" at 164.662,161.049 h1.52
  text "2" at 16.723,157.239 h1.52
  text "118.11mil (3.000mm)" at 31.959,157.239 h1.52
  text "NPTH" at 61.16,157.239 h1.52
  text "Round" at 74.009,157.239 h1.52
  text "Top Layer - Bottom Layer" at 92.648,157.239 h1.52
  text "Pad" at 130.737,157.239 h1.52
  text "Rounded" at 145.719,157.239 h1.52
  text "c0hn300m15" at 164.662,157.239 h1.52
  text "4" at 16.723,153.429 h1.52
  text "35.43mil (0.900mm)" at 31.959,153.429 h1.52
  text "PTH" at 61.16,153.429 h1.52
  text "Round" at 74.009,153.429 h1.52
  text "Top Layer - Bottom Layer" at 92.648,153.429 h1.52
  text "Pad" at 130.737,153.429 h1.52
  text "(Mixed)" at 145.719,153.429 h1.52
  text "(Mixed)" at 164.662,153.429 h1.52
  text "4" at 16.723,149.619 h1.52
  text "35.43mil (0.900mm)" at 31.959,149.619 h1.52
  text "PTH" at 61.16,149.619 h1.52
  text "Round" at 74.009,149.619 h1.52
  text "Top Layer - Bottom Layer" at 92.648,149.619 h1.52
  text "Pad" at 130.737,149.619 h1.52
  text "Rounded" at 145.719,149.619 h1.52
  text "c152h90o0_0m163mx163p0" at 164.662,149.619 h1.52
  text "4" at 16.723,145.809 h1.52
  text "62.99mil (1.600mm)" at 31.959,145.809 h1.52
  text "NPTH" at 61.16,145.809 h1.52
  text "Round" at 74.009,145.809 h1.52
  text "Top Layer - Bottom Layer" at 92.648,145.809 h1.52
  text "Pad" at 130.737,145.809 h1.52
  text "Rounded" at 145.719,145.809 h1.52
  text "c0hn160" at 164.662,145.809 h1.52
  text "4" at 16.723,141.999 h1.52
  text "133.86mil (3.400mm)" at 31.959,141.999 h1.52
  text "PTH" at 61.16,141.999 h1.52
  text "Round" at 74.009,141.999 h1.52
  text "Top Layer - Bottom Layer" at 92.648,141.999 h1.52
  text "Pad" at 130.737,141.999 h1.52
  text "Rounded" at 145.719,141.999 h1.52
  text "c440h340" at 164.662,141.999 h1.52
  text "8" at 16.723,138.189 h1.52
  text "40.16mil (1.020mm)" at 31.959,138.189 h1.52
  text "PTH" at 61.16,138.189 h1.52
  text "Round" at 74.009,138.189 h1.52
  text "Top Layer - Bottom Layer" at 92.648,138.189 h1.52
  text "Pad" at 130.737,138.189 h1.52
  text "(Mixed)" at 145.719,138.189 h1.52
  text "(Mixed)" at 164.662,138.189 h1.52
  text "12" at 16.723,134.379 h1.52
  text "47.24mil (1.200mm)" at 31.959,134.379 h1.52
  text "PTH" at 61.16,134.379 h1.52
  text "Round" at 74.009,134.379 h1.52
  text "Top Layer - Bottom Layer" at 92.648,134.379 h1.52
  text "Pad" at 130.737,134.379 h1.52
  text "Rounded" at 145.719,134.379 h1.52
  text "(Mixed)" at 164.662,134.379 h1.52
  text "16" at 16.723,130.569 h1.52
  text "31.50mil (0.800mm)" at 31.959,130.569 h1.52
  text "PTH" at 61.16,130.569 h1.52
  text "Round" at 74.009,130.569 h1.52
  text "Top Layer - Bottom Layer" at 92.648,130.569 h1.52
  text "Pad" at 130.737,130.569 h1.52
  text "(Mixed)" at 145.719,130.569 h1.52
  text "(Mixed)" at 164.662,130.569 h1.52
  text "40" at 16.723,126.759 h1.52
  text "40.95mil (1.040mm)" at 31.959,126.759 h1.52
  text "PTH" at 61.16,126.759 h1.52
  text "Round" at 74.009,126.759 h1.52
  text "Top Layer - Bottom Layer" at 92.648,126.759 h1.52
  text "Pad" at 130.737,126.759 h1.52
  text "(Mixed)" at 145.719,126.759 h1.52
  text "(Mixed)" at 164.662,126.759 h1.52
  text "136" at 16.723,122.949 h1.52
  text "19.69mil (0.500mm)" at 31.959,122.949 h1.52
  text "PTH" at 61.16,122.949 h1.52
  text "Round" at 74.009,122.949 h1.52
  text "Top Layer - Bottom Layer" at 92.648,122.949 h1.52
  text "Via" at 130.737,122.949 h1.52
  text "Rounded" at 145.719,122.949 h1.52
  text "v100h50m0mx0" at 164.662,122.949 h1.52
  text "232 Total" at 16.723,119.139 h1.52

## Dimensions
145.27,100 to 145.27,0 on Dimension
0,100 to 145.27,100 on Dimension

## Text inside footprints (layer, text, board x,y; h text height)
J1: Bottom Overlay "1" at 3.555,86.756 h1
J2: Top Overlay "1" at 76.244,33.925 h1.52; Top Overlay "5" at 87.623,34.475 h1.52; Top Overlay "G" at 82.136,22.614 h1.52
J3: Top Overlay "1" at 125.939,33.313 h1.52; Top Overlay "5" at 114.813,33.813 h1.52; Top Overlay "G" at 128.529,20.503 h1.52
J4: Bottom Overlay "1" at 31.495,86.756 h1
J5: Top Overlay "1" at 77.729,68.196 h1.52
J6: Top Overlay "1" at 115.829,68.196 h1.52